# Altium PCB PCB.PcbDoc (part 1 of 3)
Units mm, origin at the board's own origin, x right, y up, seen from the top; angles counter-clockwise.
Board outline 60 x 50 mm, 4 copper layers (Top Layer, Layer 3, Layer 4, Bottom Layer), stack 0.999 mm thick; 112 components, 71 nets, 399 pads, 37 vias.
Unrouted connection lines stored in the file: 18.
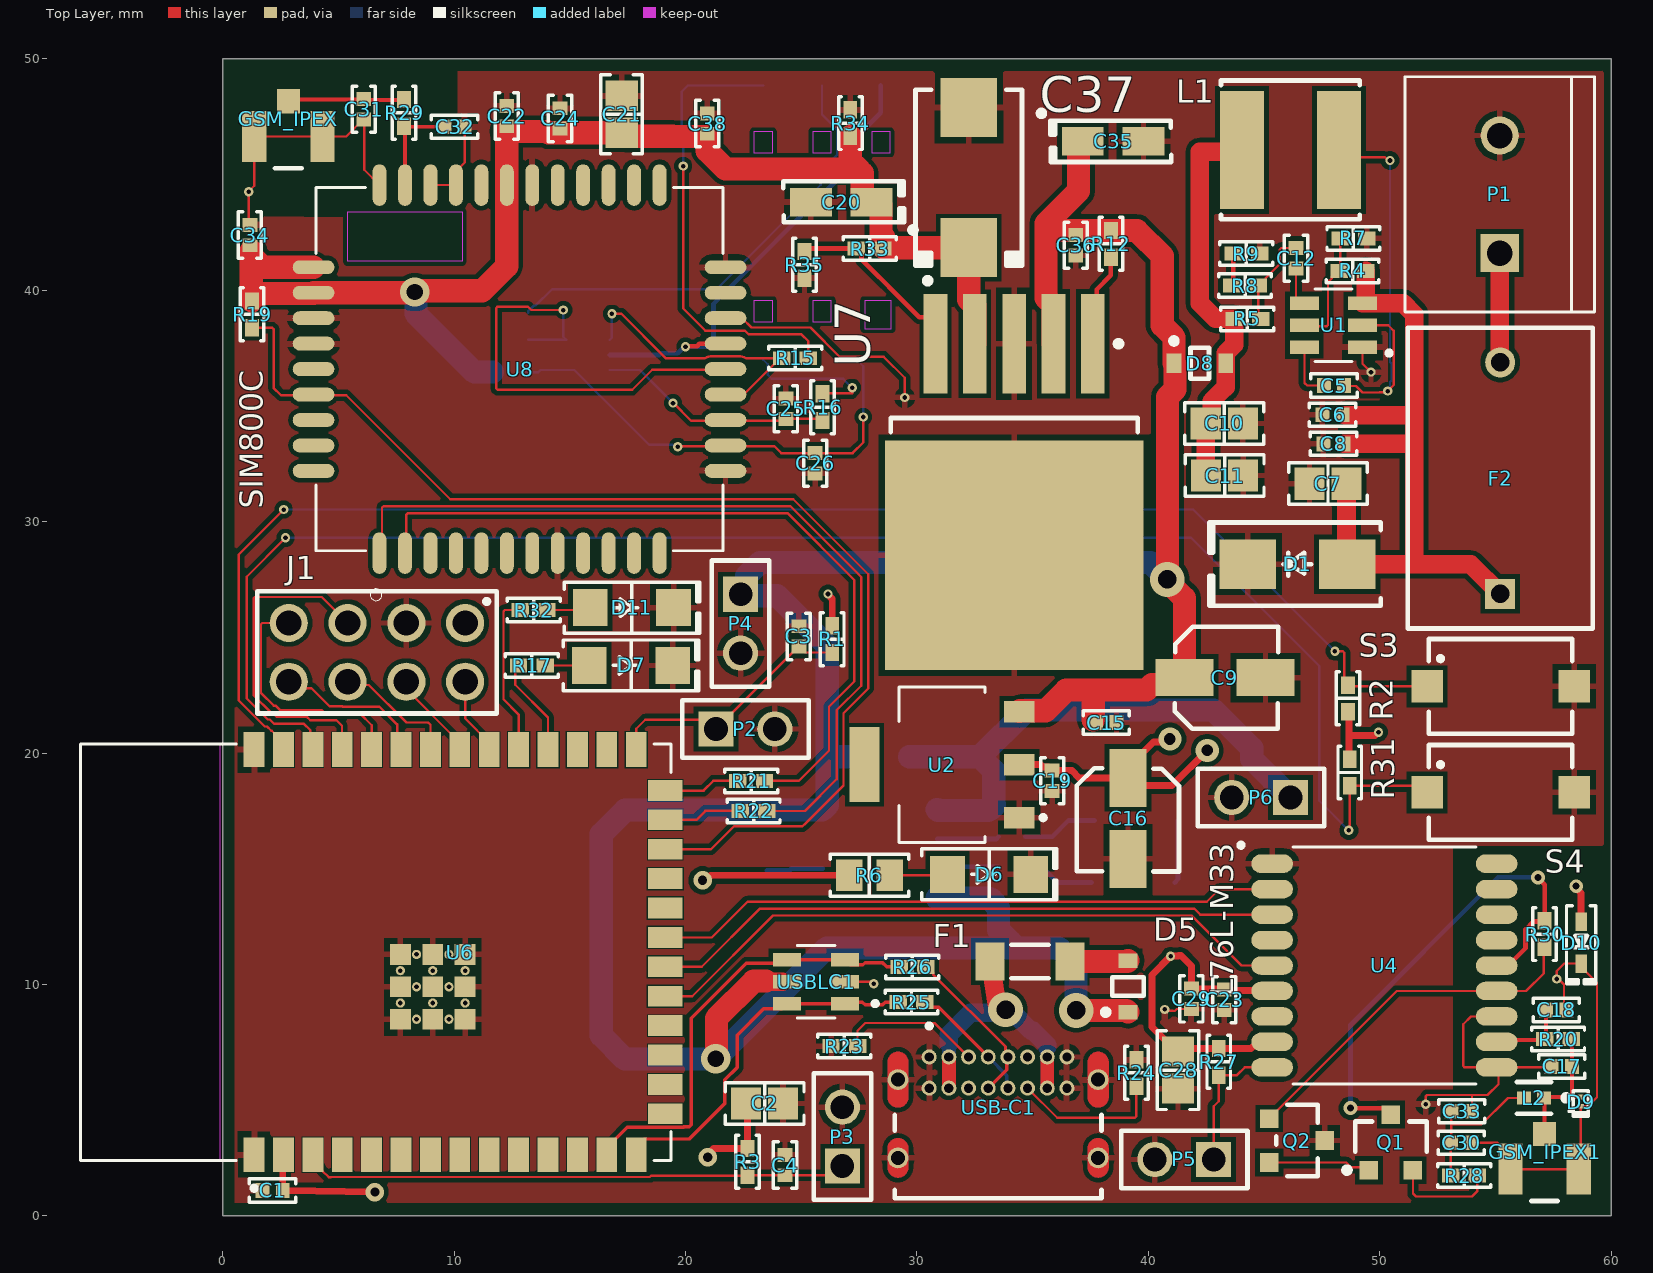
[diagram p0: Top Layer view]
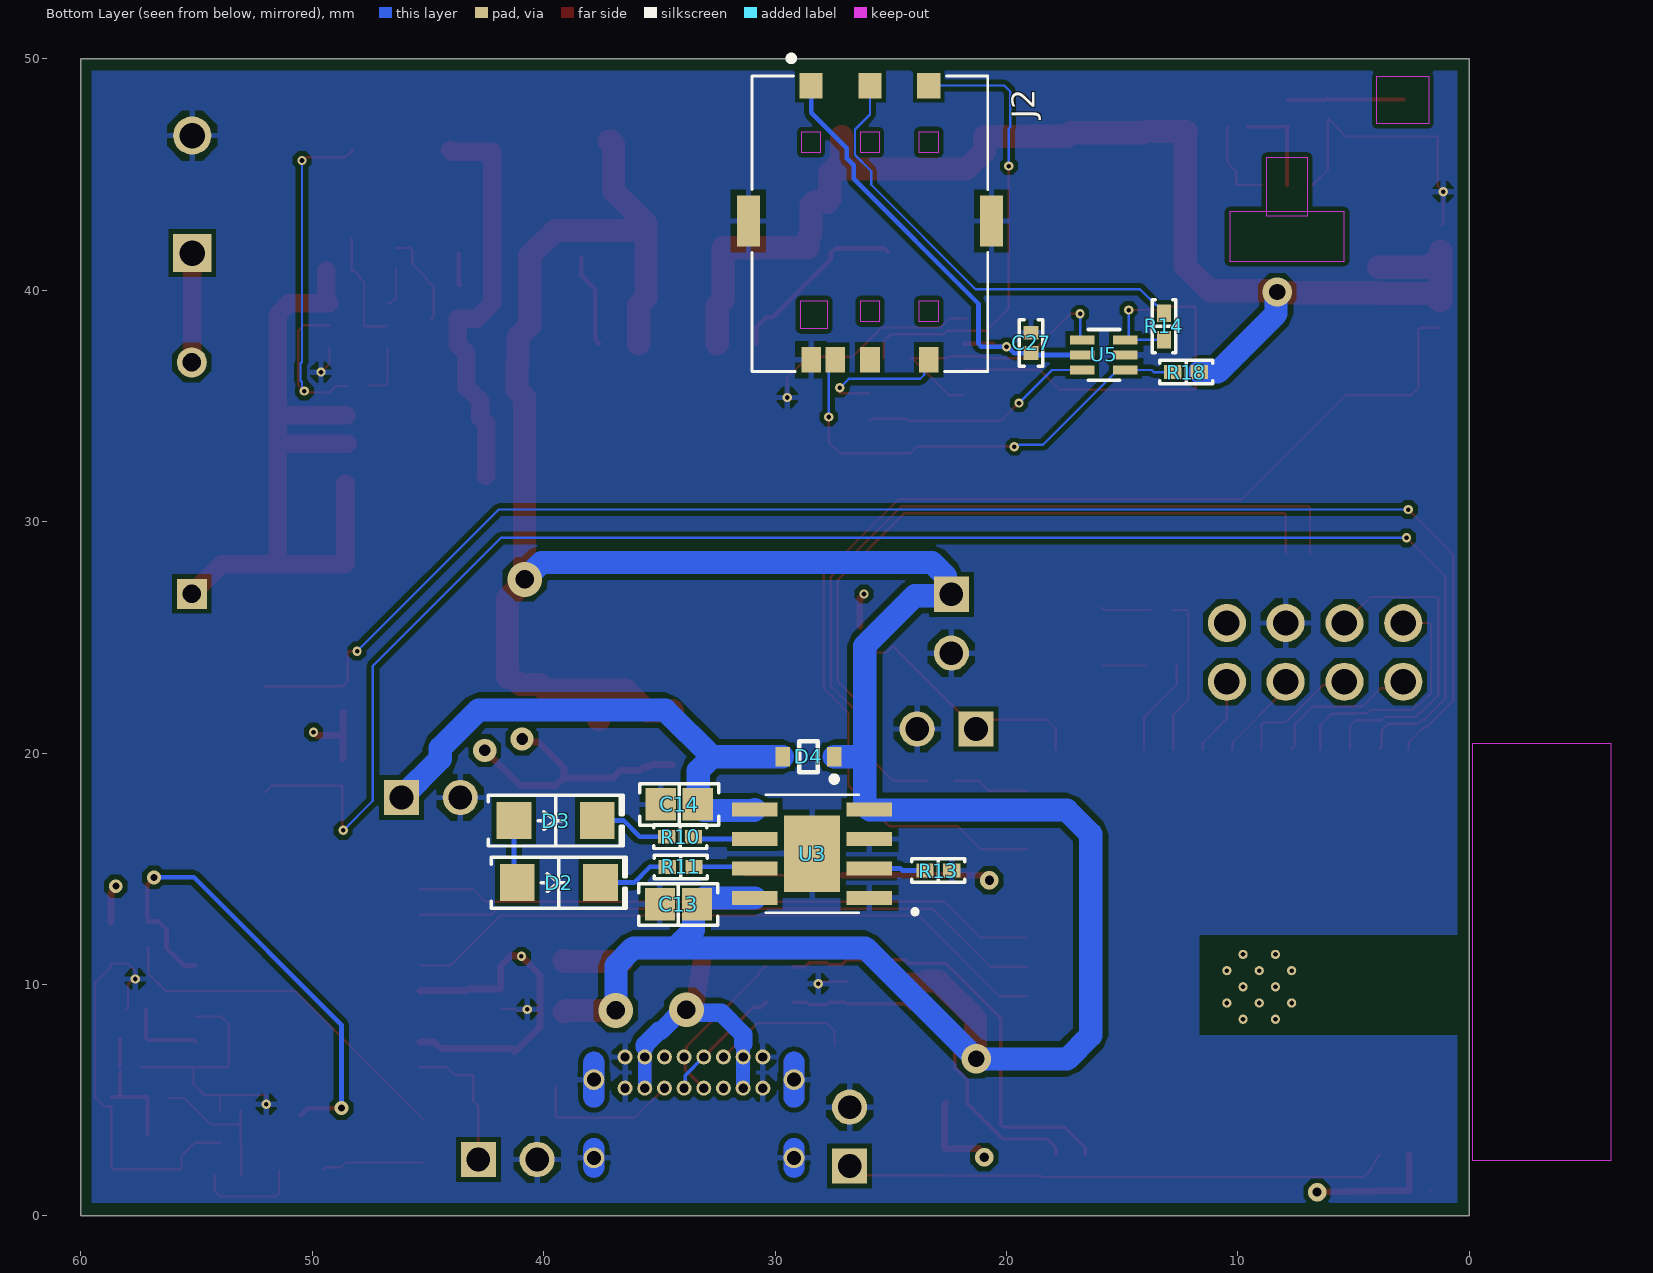
[diagram p1: Bottom Layer view, seen from below]
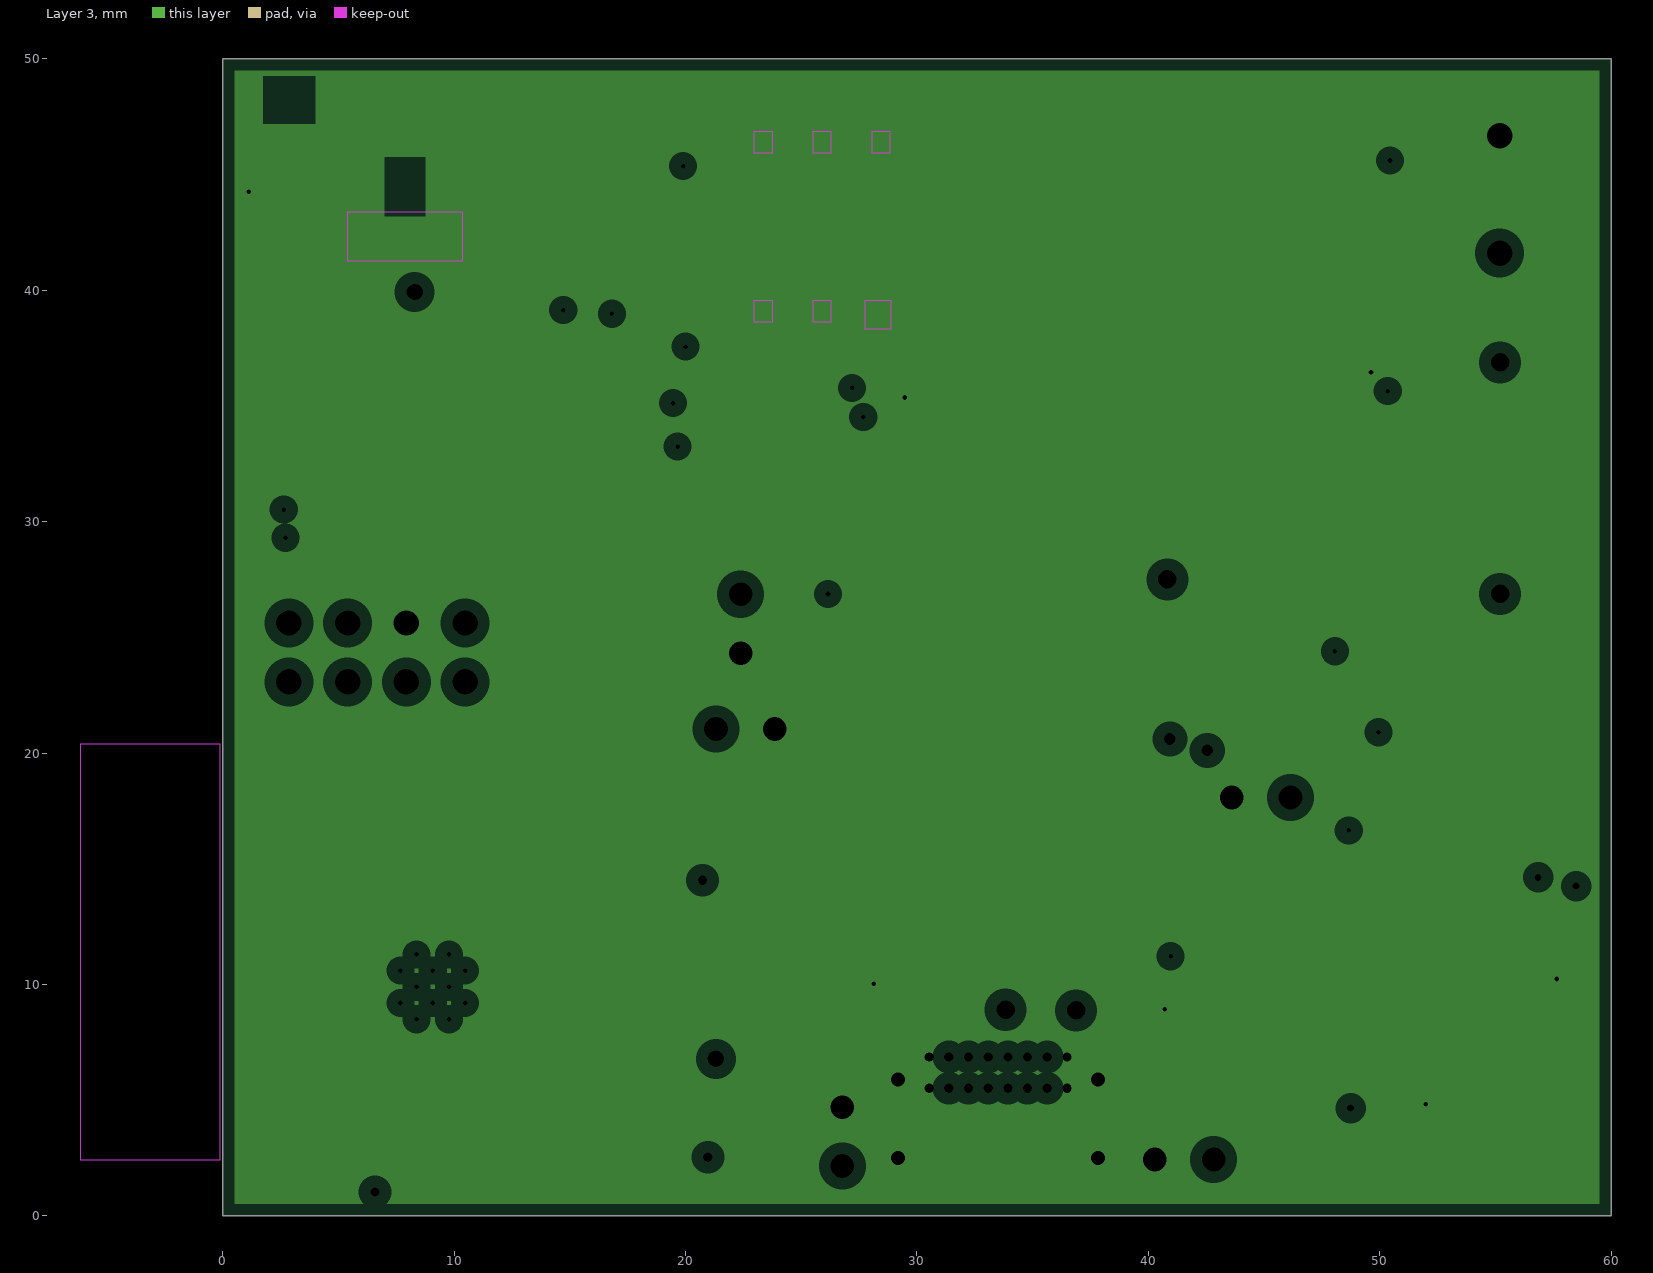
[diagram p2: Layer 3, clearances drawn from the general rule]
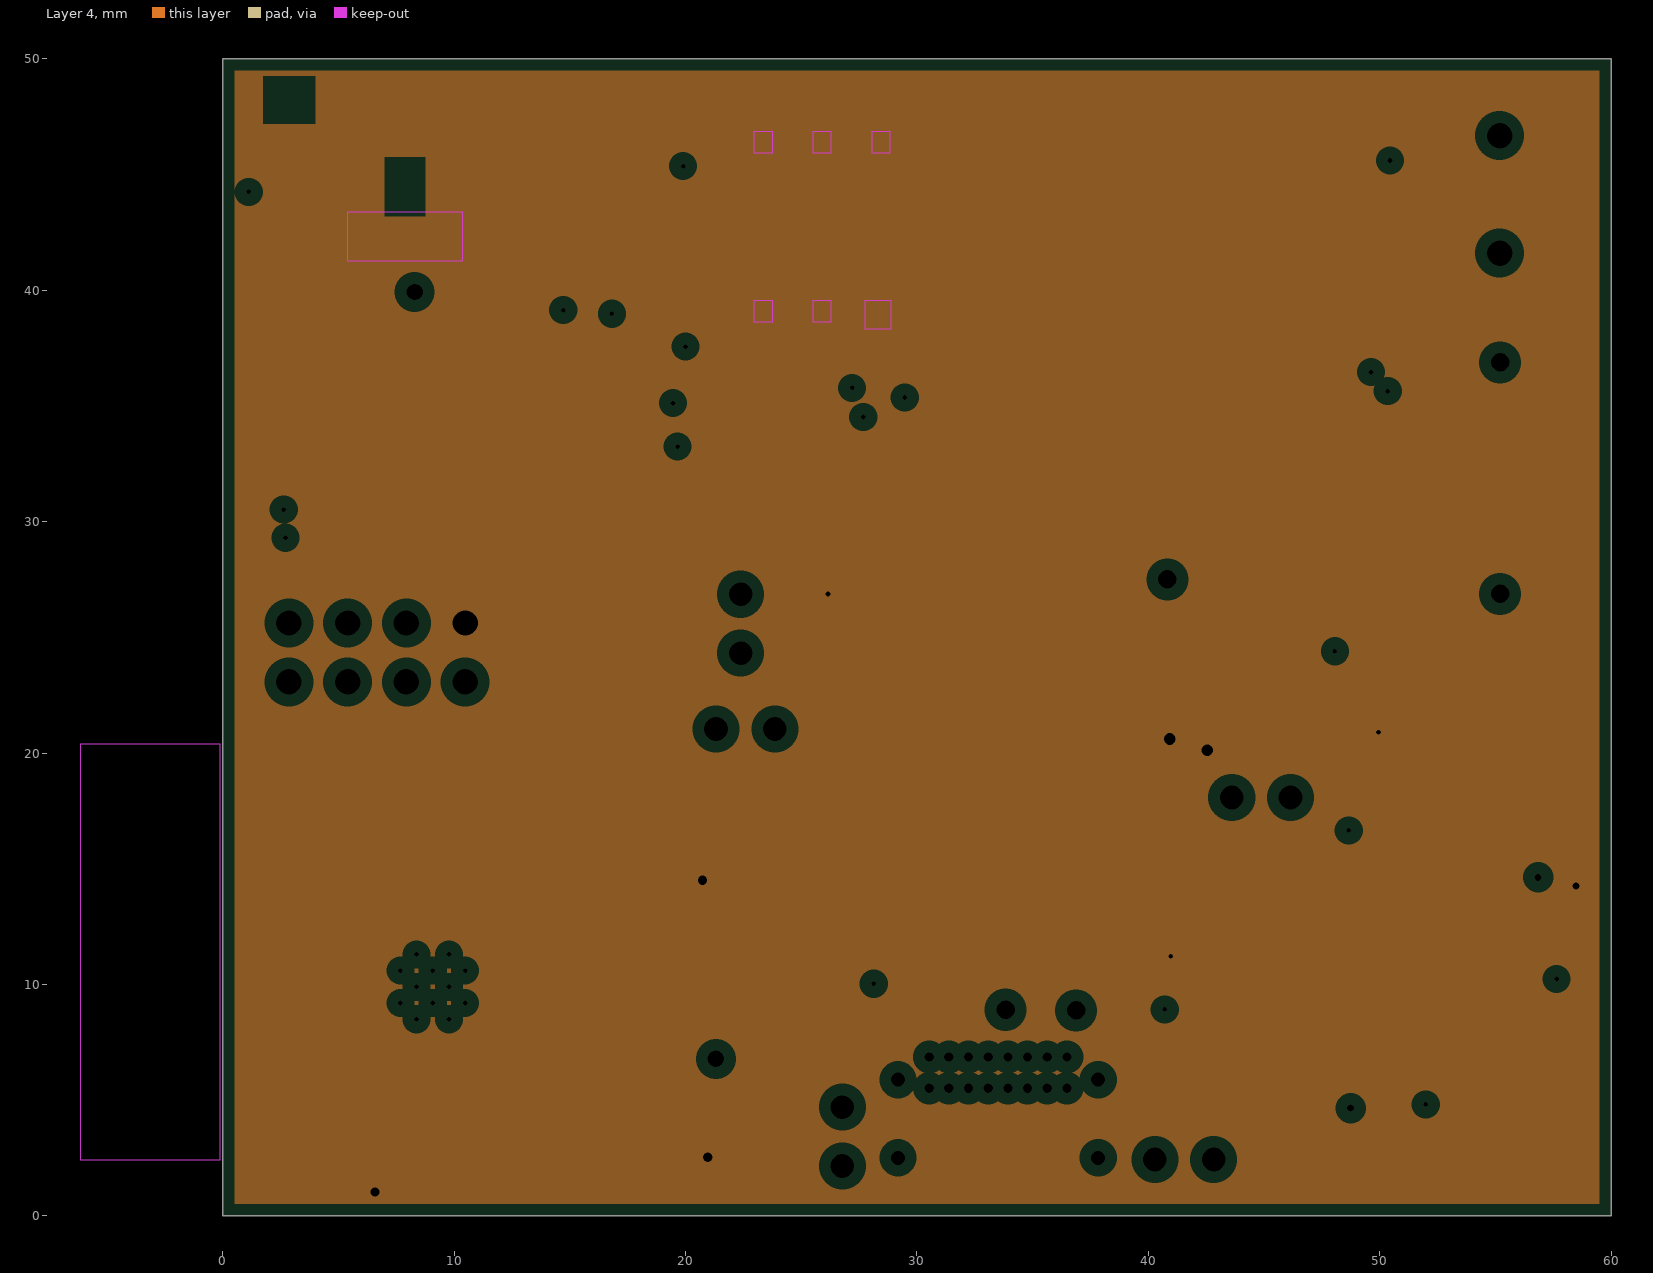
[diagram p3: Layer 4, clearances drawn from the general rule]

## Layer stack, top to bottom
Top Solder: solder mask 0.0102, Solder Resist, Dk 3.5
Top Layer: signal copper 0.035
Dielectric 2: prepreg 0.0994, PP-006, Dk 4.1
Layer 3: plane copper 0.0152, net GND
Dielectric 1: dielectric 0.7, FR-4, Dk 4.8
Layer 4: plane copper 0.0152, net 3V3
Dielectric 3: prepreg 0.0994, PP-006, Dk 4.1
Bottom Layer: signal copper 0.035
Bottom Solder: solder mask 0.0102, Solder Resist, Dk 3.5

## Board outline
0,0 60,0 60,50 0,50

## Design rules (kind name [scope] priority, off if disabled: settings)
Clearance Clearance_sim [InNet('SIM_DET') vs InNet('GND')] p1: gap=0.19 ignorepadtopadclearanceinfootprint=FALSE
Clearance POWER [InNetClass('HIGH VOLTAGE') vs InNet('3V3')] p2: gap=0.2 ignorepadtopadclearanceinfootprint=FALSE
Clearance RF [InNet('GSM_IPEX') vs InNet('RF_IN')] p3: gap=0.5 ignorepadtopadclearanceinfootprint=FALSE
Clearance Clearance_esp32 [InComponent('U6')] p4: gap=0.05 ignorepadtopadclearanceinfootprint=FALSE
Clearance [All] p5: gap=0.2 ignorepadtopadclearanceinfootprint=FALSE
DiffPairsRouting [InDifferentialPairClass('New Class')] p1: maxlimit=0.127 minlimit=0.127 mostfreqgap=0.127 toplayer_minwidth=0.149 toplayer_maxwidth=0.149 toplayer_prefwidth=0.149 bottomlayer_minwidth=0.149 bottomlayer_maxwidth=0.149 bottomlayer_prefwidth=0.149 impedanceprofiledriven=TRUE impedanceprofileid={9743313B-206F-43D8-A250-08B49E2D991E} impedanceprofilevalue=90.000000 maxuncoupledlength=12.7
MinimumSolderMaskSliver [All] p1: minsoldermaskwidth=0
PlaneClearance [All] p1: clearance=0.508
PlaneConnect [All] p1: planeconnectstyle=Direct reliefexpansion=0.508 reliefentries=4 reliefconductorwidth=0.254 reliefairgap=0.254
PolygonConnect U6_GND_Connect [InComponent('U6') vs InPolygon] p1: connectstyle=Relief reliefconductorwidth=0.2 reliefentries=4 polygonreliefangle="90 Angle" airgapwidth=0.2
PolygonConnect [All] p2: connectstyle=Relief reliefconductorwidth=0.254 reliefentries=4 polygonreliefangle="90 Angle" airgapwidth=0.254
RoutingVias [All] p1: holewidth=0.711 width=1.27 viastyle="Through Hole" minholewidth=0.711 minwidth=1.27 maxholewidth=0.711 maxwidth=1.27
SilkToSilkClearance [All] p1: silktosilkclearance=0
SilkToSolderMaskClearance [All] p1: minsilkscreentomaskgap=0 clearancetoexposedcopper=TRUE
SolderMaskExpansion [All] p1: expansion=0.102 istentingtop=FALSE
SupplyNets "Schematic Supply Nets_6" [InNet('VDD')] p1: voltage=0.000
SupplyNets "Schematic Supply Nets_5" [InNet('3V3')] p2: voltage=0.000
SupplyNets "Schematic Supply Nets_3" [InNet('Vout')] p3: voltage=0.000
SupplyNets "Schematic Supply Nets_7" [InNet('VUSB')] p4: voltage=0.000
SupplyNets "Schematic Supply Nets_4" [InNet('GND')] p5: voltage=0.000
SupplyNets "Schematic Supply Nets_2" [InNet('VBAT')] p6: voltage=0.000
SupplyNets "Schematic Supply Nets_1" [InNet('Vin')] p7: voltage=0.000
SupplyNets "Schematic Supply Nets" [InNet('+12')] p8: voltage=0.000
Width Width_RF [InNetClass('RF_CLASSES')] p1: maxlimit=0.171 minlimit=0.171 preferedwidth=0.171 impedanceprofiledriven=TRUE impedanceprofileid={86A5E7C3-8E26-480E-B059-BB30D701D17A} impedanceprofilevalue=50.000000 minimp=50.000000 maximp=50.000000 favimp=50.000000 checkconnectedcopper=TRUE
Width "HIGH POWER" [InNetClass('HIGH VOLTAGE')] p2: maxlimit=1.3 minlimit=0.6 preferedwidth=1
Width 3.3v [InNet('3V3')] p3: maxlimit=0.3 minlimit=0.3 preferedwidth=0.3
Width [All] p4: maxlimit=0.2 minlimit=0.1 preferedwidth=0.1
24 further rules are at their usual default settings.

## Classes and differential pairs
net class Diff_Pair: US_N US_P USBC_N USBC_P
net class RF_CLASSES: GSM GSM_IPEX IPEX_GPS RF_IN
net class "HIGH VOLTAGE": +12 NetF2_2 V_B VBAT VDD Vin Vout VUSB
component class USB-C: F1 R23 R24 R25 R26 USB-C1 USBLC1
component class SIM: C20 C21 C22 C24 C25 C26 C27 C31 C32 C34 C35 C36 C37 C38 GSM_IPEX J2 R12 R14 R15 R16 R18 R19 R21 R22 R29 R33 R34 R35 U5 U7 U8
component class MCU: C1 C2 C3 C4 D7 D11 J1 P2 P3 R1 R2 R3 R17 R31 R32 S3 S4 U6
component class GPS_GNSS: C17 C18 C23 C28 C29 C30 C33 D9 D10 GSM_IPEX1 L2 P5 Q1 Q2 R20 R27 R28 R30 U4
component class Alimentation: C5 C6 C7 C8 C9 C10 C11 C12 C13 C14 C15 C16 C19 D1 D2 D3 D4 D5 D6 D8 F2 L1 P1 P4 P6 R4 R5 R6 R7 R8 R9 R10 R11 R13 U1 U2 U3
differential pair US: +US_P -US_N
differential pair USBC: +USBC_P -USBC_N

## Components (designator, comment, footprint, x,y, rotation, side; value= is the part's Value field where it differs from the comment)
C1 "0.1 µF" "CAP 0402_1005" 2.16,1.1 r0 top
C2 "22 µF" "CAP 0805_2012" 23.42,4.86 r180 top
C3 "0.1 µF" "CAP 0402_1005" 24.9,25.04 r270 top
C4 "0.1 µF" "CAP 0402_1005" 24.3,2.2 r270 top
C5 "0.1 µF" "CAP 0402_1005" 48.02,35.88 r0 top
C6 "0.1 µF" "CAP 0402_1005" 47.96,34.62 r0 top
C7 "10 µF" "CAP 0805_2012" 47.76,31.64 r0 top
C8 "0.1 µF" "CAP 0402_1005" 48,33.36 r0 top
C9 "10 µF" "CAP ALSMD 4.3MM H5.4MM" 43.31,23.26 r0 top
C10 "22 µF" "CAP 0805_2012" 43.28,34.24 r180 top
C11 "22 µF" "CAP 0805_2012" 43.295,31.992 r180 top
C12 "75 pF" "CAP 0402_1005" 46.38,41.38 r270 top
C13 "10 µF" "CAP 0805_2012" 34.18,13.46 r180 bottom
C14 "10 µF" "CAP 0805_2012" 34.14,17.78 r180 bottom
C15 "0.1 µF" "CAP 0402_1005" 38.18,21.32 r180 top
C16 "22 µF" "CAP ALSMD 4.3MM H5.4MM" 39.12,17.18 r270 top
C17 "Value" "CAP 0402_1005" 57.86,6.46 r0 top
C18 "Value" "CAP 0402_1005" 57.62,8.9 r180 top
C19 "0.1 µF" "CAP 0402_1005" 35.84,18.8 r90 top
C20 "100 µF" "CAP POL 1206_3216" 26.73,43.8 r180 top
C21 "10 µF" "CAP 0805_2012" 17.24,47.6 r270 top
C22 "4.7 µF" "CAP 0402_1005" 12.28,47.52 r270 top
C23 "Value" "CAP 0402_1005" 43.28,9.34 r90 top
C24 "Value" "CAP 0402_1005" 14.58,47.42 r270 top
C25 "47 pF" "CAP 0402_1005" 24.34,34.88 r270 top
C26 "47 pF" "CAP 0402_1005" 25.6,32.52 r90 top
C27 "0.1 µF" "CAP 0402_1005" 18.94,37.72 r270 bottom
C28 "10 µF" "CAP 0805_2012" 41.28,6.3 r90 top
C29 "0.1 µF" "CAP 0402_1005" 41.86,9.38 r90 top
C30 "0.1 µF" "CAP 0402_1005" 53.52,3.16 r180 top
C31 "Value" "CAP 0402_1005" 6.1,47.82 r90 top
C32 "Value" "CAP 0402_1005" 10.02,47.06 r180 top
C33 "100 pF" "CAP 0402_1005" 53.54,4.52 r180 top
C34 "10 pF" "CAP 0402_1005" 1.18,42.38 r270 top
C35 "100 µF" "CAP POL 1206_3216" 38.48,46.44 r0 top
C36 "1 µF" "CAP 0402_1005" 36.86,41.94 r90 top
C37 "330 µF" "CAP POL 2917_7343" 32.24,44.86 r90 top
C38 "0.1 µF" "CAP 0402_1005" 20.94,47.2 r270 top
D1 "SMBJ15CA" "DO214AA SMB" 46.44,28.16 r180 top
D2 "Red" "LED 1206_3216 RED" 39.34,14.405 r180 bottom
D3 "Green" "LED 1206_3216 GREEN" 39.48,17.085 r180 bottom
D4 "NSR0320MW2T1G" ONSC-SOD-323-2-477-02_V 28.56,19.84 r0 bottom
D5 "NSR0320MW2T1G" ONSC-SOD-323-2-477-02_V 39.12,9.92 r90 top
D6 "Red" "LED 1206_3216 RED" 33.12,14.76 r0 top
D7 "Red" "LED 1206_3216 RED" 17.647,23.785 r0 top
D8 "NSR0320MW2T1G" ONSC-SOD-323-2-477-02_V 42.22,36.84 r0 top
D9 "PESD5V0S1USF,315" "NEXPERIA SOD962-2 DSN0603-2" 58.68,4.94 r90 top
D10 "ESD5Z3.3T5G" SOD523F 58.7,11.805 r270 top
D11 "Yellow" "LED 1206_3216 YELLOW" 17.685,26.285 r0 top
F1 "MFU1206FF00750P100" "FUSE 1206_3216 0.6MM" 34.885,11 r0 top
F2 "0259003.MX913" FP-0259-MFG 55.2,31.88 r90 top
GSM_IPEX "U.FL-R-SMT-1(10)" FP-U_FL-R-SMT-1_10-MFG 2.84,46.64 r0 top
GSM_IPEX1 "U.FL-R-SMT-1(10)" FP-U_FL-R-SMT-1_10-MFG 57.12,2.02 r0 top
J1 "JTAG" 61300821121 6.67,24.35 r180 top
J2 "2452808-1" *TE_2452808-1_2452808-1(Primary) 25.9,42.915 r0 bottom
L1 "10 µH" "TDK VLS6045EX" 46.14,46.06 r180 top
L2 "LQG15HS47NJ02J" FP-LQG15HH_02-IPC_B 56.66,5.1 r180 top
P1 "282837-2" *TE_282837-2 55.18,44.14 r90 top
P2 "MTLW-102-05-G-S-172" SMTC-MTLW-102-05-X-S-172 21.32,21.04 r0 top
P3 "MTLW-102-05-G-S-172" SMTC-MTLW-102-05-X-S-172 26.78,2.16 r90 top
P4 "MTLW-102-05-G-S-172" SMTC-MTLW-102-05-X-S-172 22.38,26.86 r270 top
P5 "MTLW-102-05-G-S-172" SMTC-MTLW-102-05-X-S-172 42.82,2.44 r180 top
P6 "MTLW-102-05-G-S-172" SMTC-MTLW-102-05-X-S-172 46.14,18.08 r180 top
Q1 "AO3401A" AO-SOT-23-3L_V 50.48,3.18 r90 top
Q2 "AO3400A" FP-SOT23-MFG 46.42,3.26 r0 top
R1 "10 kOhms" "RES 0402_1005" 26.34,24.92 r90 top
R2 "10 kOhms" "RES 0402_1005" 48.62,22.36 r270 top
R3 "10 kOhms" "RES 0402_1005" 22.68,2.34 r90 top
R4 "511 kOhms" "RES 0402_1005" 48.82,40.835 r0 top
R5 "49.9 Ohms" "RES 0402_1005" 44.275,38.76 r180 top
R6 "330 mOhms" "RES 0805_2012" 27.945,14.72 r180 top
R7 "105 kOhms" "RES 0402_1005" 48.86,42.235 r180 top
R8 "78.7 kOhms" "RES 0402_1005" 44.175,40.2 r0 top
R9 "13.3 kOhms" "RES 0402_1005" 44.235,41.58 r180 top
R10 "1 kOhms" "RES 0402_1005" 34.1,16.385 r0 bottom
R11 "1 kOhms" "RES 0402_1005" 34.08,15.08 r0 bottom
R12 "10 kOhms" "RES 0402_1005" 38.38,42 r90 top
R13 "1 kOhms" "RES 0402_1005" 22.945,14.925 r0 bottom
R14 "51 Ohms" "RES 0402_1005" 13.2,38.435 r90 bottom
R15 "51 Ohms" "RES 0402_1005" 24.735,37.06 r0 top
R16 "51 Ohms" "RES 0402_1005" 25.92,34.945 r270 top
R17 "1 kOhms" "RES 0402_1005" 13.36,23.78 r180 top
R18 "4.7 kOhms" "RES 0402_1005" 12.24,36.46 r0 bottom
R19 "10 kOhms" "RES 0402_1005" 1.272,38.954 r90 top
R20 "0 Ohms" "RES 0402_1005" 57.7,7.64 r180 top
R21 "1 kOhms" "RES 0402_1005" 22.84,18.8 r180 top
R22 "1 kOhms" "RES 0402_1005" 22.94,17.5 r0 top
R23 "5.1 kOhms" "RES 0402_1005" 26.86,7.34 r0 top
R24 "5.1 kOhms" "RES 0402_1005" 39.48,6.18 r270 top
R25 "22 Ohms" "RES 0402_1005" 29.765,9.24 r0 top
R26 "22 Ohms" "RES 0402_1005" 29.805,10.76 r0 top
R27 "10 kOhms" "RES 0402_1005" 43.04,6.66 r90 top
R28 "10 Ohms" "RES 0402_1005" 53.64,1.74 r0 top
R29 "0 Ohms" "RES 0402_1005" 7.84,47.66 r270 top
R30 "10 kOhms" "RES 0402_1005" 57.12,12.18 r90 top
R31 "10 kOhms" "RES 0402_1005" 48.7,19.16 r90 top
R32 "1 kOhms" "RES 0402_1005" 13.44,26.18 r180 top
R33 "100 kOhms" "RES 0402_1005" 27.96,41.8 r0 top
R34 "470 Ohms" "RES 0402_1005" 27.12,47.22 r270 top
R35 "43 kOhms" "RES 0402_1005" 25.14,41.095 r90 top
S3 "434123025816" 434123025816 55.22,22.88 r0 top
S4 "434123025816" 434123025816 55.22,18.3 r0 top
U1 "" TPS54302DDCR 48,38.48 r180 top
U2 "AMS1117-3.3" "AMS1117 3.3V" 31.08,19.5 r90 top
U3 "TP4056" TP4056 28.4,15.65 r0 bottom
U4 "L76L-M33" *XCVR_L76L-M33 50.2,10.82 r0 top
U5 "SMF05CT1G" *SOT65P210X110-6N 15.795,37.2 r0 bottom
U6 "ESP32-S3-WROOM-1-N8R2" *XCVR_ESP32-S3-WROOM-1-N8R2_ESP32-S3-WROOM-1-N8R2(Primary) 6.62,11.4 r90 top
U7 "MIC29302AWU-TR" FP-T0263-5LD-PL-1-MFG 34.2,31.715 r180 top
U8 "SIM800C" SIM800C 12.83,36.59 r90 top
USB-C1 "USB4085-GF-A_REVA4" "Conn Type C 2.0" 33.505,2.51 r0 top
USBLC1 "USBLC6-2SC6" USBLC6-2SC6 25.64,10.12 r180 top

## Footprints (in the part's own frame and the unit in brackets; to place one, negate y for a bottom-side part, rotate by r counter-clockwise, add the part's x,y. Pads: shape width x height; smd on the part's side, far side on the other; paste and mask are expansions set on the pad)
61300821121 [mm]
  round 1.65 hole 1.1: 1(-3.81,-1.27) 2(-3.81,1.27) 3(-1.27,-1.27) 4(-1.27,1.27) 5(1.27,-1.27) 6(1.27,1.27) 7(3.81,-1.27) 8(3.81,1.27)
  silkscreen extent -5.18,-2.64 5.18,2.64, body extent -4.95,-2.54 5.21,2.54, height 8.54
434123025816 [mm]
  rect 1.35x1.4 smd paste+0 mask+0.102: 1(-3.175,0) 2(3.175,0)
  silkscreen extent -3.1,-2.05 3.1,2.05, body extent -3.5,-1.95 3.5,1.95, height 2.5
*SOT65P210X110-6N [mm]
  rect 1.06x0.39 smd: 1(-0.935,0.65) 2(-0.935,0) 3(-0.935,-0.65) 4(0.935,-0.65) 5(0.935,0) 6(0.935,0.65)
  silkscreen extent -0.68,-1.1 0.68,1.1, body extent -1.05,-1 1.05,1, height 1.1
*TE_282837-2 [mm]
  rect 1.65x1.65 hole 1.1: 1(-2.54,0)
  round 1.65 hole 1.1: 2(2.54,0)
  silkscreen extent -5.08,-4.1 5.08,4.1, body extent -5.46,-4.19 5.3,4.01, height 10.25
*TE_2452808-1_2452808-1(Primary) [mm]
  rect 1x1.1 smd: C1(2.54,-5.925) C2(0,-5.925) C3(-2.54,-5.925)
  rect 0.85x1.1 smd: C5(2.54,5.925) C6(0,5.925) C7(-2.54,5.925) SW(1.5,5.925)
  rect 1x2.2 smd: GND8(-5.25,-0.075) GND9(5.25,-0.075)
  Keep-Out Layer region: -2.94,4.275 -2.14,4.275 -2.14,3.375 -2.94,3.375
  Keep-Out Layer region: -0.4,4.275 0.4,4.275 0.4,3.375 -0.4,3.375
  Keep-Out Layer region: 1.84,4.575 2.99,4.575 2.99,3.375 1.84,3.375
  Keep-Out Layer region: -2.94,-3.025 -2.14,-3.025 -2.14,-3.925 -2.94,-3.925
  Keep-Out Layer region: -0.4,-3.025 0.4,-3.025 0.4,-3.925 -0.4,-3.925
  Keep-Out Layer region: 2.14,-3.025 2.94,-3.025 2.94,-3.925 2.14,-3.925
  Keep-Out Layer region: -2.94,4.275 -2.14,4.275 -2.14,3.375 -2.94,3.375
  Keep-Out Layer region: -0.4,4.275 0.4,4.275 0.4,3.375 -0.4,3.375
  Keep-Out Layer region: 1.84,4.575 2.99,4.575 2.99,3.375 1.84,3.375
  Keep-Out Layer region: -2.94,-3.025 -2.14,-3.025 -2.14,-3.925 -2.94,-3.925
  Keep-Out Layer region: -0.4,-3.025 0.4,-3.025 0.4,-3.925 -0.4,-3.925
  Keep-Out Layer region: 2.14,-3.025 2.94,-3.025 2.94,-3.925 2.14,-3.925
  Keep-Out Layer region: -2.94,4.275 -2.14,4.275 -2.14,3.375 -2.94,3.375
  Keep-Out Layer region: -0.4,4.275 0.4,4.275 0.4,3.375 -0.4,3.375
  Keep-Out Layer region: 1.84,4.575 2.99,4.575 2.99,3.375 1.84,3.375
  Keep-Out Layer region: -2.94,-3.025 -2.14,-3.025 -2.14,-3.925 -2.94,-3.925
  Keep-Out Layer region: -0.4,-3.025 0.4,-3.025 0.4,-3.925 -0.4,-3.925
  Keep-Out Layer region: 2.14,-3.025 2.94,-3.025 2.94,-3.925 2.14,-3.925
  Keep-Out Layer region: -2.94,4.275 -2.14,4.275 -2.14,3.375 -2.94,3.375
  Keep-Out Layer region: -0.4,4.275 0.4,4.275 0.4,3.375 -0.4,3.375
  Keep-Out Layer region: 1.84,4.575 2.99,4.575 2.99,3.375 1.84,3.375
  Keep-Out Layer region: -2.94,-3.025 -2.14,-3.025 -2.14,-3.925 -2.94,-3.925
  Keep-Out Layer region: -0.4,-3.025 0.4,-3.025 0.4,-3.925 -0.4,-3.925
  Keep-Out Layer region: 2.14,-3.025 2.94,-3.025 2.94,-3.925 2.14,-3.925
  Keep-Out Layer region: -2.94,4.275 -2.14,4.275 -2.14,3.375 -2.94,3.375
  Keep-Out Layer region: -0.4,4.275 0.4,4.275 0.4,3.375 -0.4,3.375
  Keep-Out Layer region: 1.84,4.575 2.99,4.575 2.99,3.375 1.84,3.375
  Keep-Out Layer region: -2.94,-3.025 -2.14,-3.025 -2.14,-3.925 -2.94,-3.925
  Keep-Out Layer region: -0.4,-3.025 0.4,-3.025 0.4,-3.925 -0.4,-3.925
  Keep-Out Layer region: 2.14,-3.025 2.94,-3.025 2.94,-3.925 2.14,-3.925
  Keep-Out Layer region: -2.94,4.275 -2.14,4.275 -2.14,3.375 -2.94,3.375
  Keep-Out Layer region: -0.4,4.275 0.4,4.275 0.4,3.375 -0.4,3.375
  Keep-Out Layer region: 1.84,4.575 2.99,4.575 2.99,3.375 1.84,3.375
  Keep-Out Layer region: -2.94,-3.025 -2.14,-3.025 -2.14,-3.925 -2.94,-3.925
  Keep-Out Layer region: -0.4,-3.025 0.4,-3.025 0.4,-3.925 -0.4,-3.925
  Keep-Out Layer region: 2.14,-3.025 2.94,-3.025 2.94,-3.925 2.14,-3.925
  silkscreen extent -5.09,-7.22 5.09,6.44, body extent -5.43,-5.87 5.43,6.58, height 1.37
*XCVR_ESP32-S3-WROOM-1-N8R2_ESP32-S3-WROOM-1-N8R2(Primary) [mm]
  rect 1.5x0.9 smd: 1(-8.75,5.26) 2(-8.75,3.99) 3(-8.75,2.72) 4(-8.75,1.45) 5(-8.75,0.18) 6(-8.75,-1.09) 7(-8.75,-2.36) 8(-8.75,-3.63) 9(-8.75,-4.9) 10(-8.75,-6.17) 11(-8.75,-7.44) 12(-8.75,-8.71) 13(-8.75,-9.98) 14(-8.75,-11.25) 27(8.75,-11.25) 28(8.75,-9.98) 29(8.75,-8.71) 30(8.75,-7.44) 31(8.75,-6.17) 32(8.75,-4.9) 33(8.75,-3.63) 34(8.75,-2.36) 35(8.75,-1.09) 36(8.75,0.18) 37(8.75,1.45) 38(8.75,2.72) 39(8.75,3.99) 40(8.75,5.26)
  rect 0.9x1.5 smd: 15(-6.985,-12.5) 16(-5.715,-12.5) 17(-4.445,-12.5) 18(-3.175,-12.5) 19(-1.905,-12.5) 20(-0.635,-12.5) 21(0.635,-12.5) 22(1.905,-12.5) 23(3.175,-12.5) 24(4.445,-12.5) 25(5.715,-12.5) 26(6.985,-12.5)
  rect 0.9x0.9 smd: 41_1(-1.5,-2.46) 41_2(-2.9,-2.46) 41_3(-0.1,-2.46) 41_4(-2.9,-3.86) 41_5(-1.5,-3.86) 41_6(-0.1,-3.86) 41_7(-2.9,-1.06) 41_8(-1.5,-1.06) 41_9(-0.1,-1.06)
  round 0.4 hole 0.2: 41_10(-1.5,-1.76) 41_11(-2.9,-1.76) 41_12(-0.1,-1.76) 41_13(-2.9,-3.16) 41_14(-1.5,-3.16) 41_15(-0.1,-3.16) 41_16(-2.2,-1.06) 41_17(-0.8,-1.06) 41_18(-2.2,-2.46) 41_19(-0.8,-2.46) 41_20(-2.2,-3.86) 41_21(-0.8,-3.86)
  Keep-Out Layer region: -9,12.75 9,12.75 9,6.75 -9,6.75
  Keep-Out Layer region: -9,12.75 9,12.75 9,6.75 -9,6.75
  Keep-Out Layer region: -9,12.75 9,12.75 9,6.75 -9,6.75
  Keep-Out Layer region: -9,12.75 9,12.75 9,6.75 -9,6.75
  Keep-Out Layer region: -9,12.75 9,12.75 9,6.75 -9,6.75
  Keep-Out Layer region: -9,12.75 9,12.75 9,6.75 -9,6.75
  Keep-Out Layer region: -9,12.75 9,12.75 9,6.75 -9,6.75
  Keep-Out Layer region: -9,12.75 9,12.75 9,6.75 -9,6.75
  Keep-Out Layer region: -9,12.75 9,12.75 9,6.75 -9,6.75
  silkscreen extent -10.3,-12.75 9,12.75, body extent -9,-12.75 9,12.75, height 3.25
*XCVR_L76L-M33 [mm]
  oval 1.8x0.8 smd: 1(-4.85,4.4) 2(-4.85,3.3) 3(-4.85,2.2) 4(-4.85,1.1) 5(-4.85,0) 6(-4.85,-1.1) 7(-4.85,-2.2) 8(-4.85,-3.3) 9(-4.85,-4.4) 10(4.85,-4.4) 11(4.85,-3.3) 12(4.85,-2.2) 13(4.85,-1.1) 14(4.85,0) 15(4.85,1.1) 16(4.85,2.2) 17(4.85,3.3) 18(4.85,4.4)
  silkscreen extent -6.3,-5.13 3.95,5.3, body extent -4.85,-5.05 4.85,5.05, height 2.49
"AMS1117 3.3V" [mm]
  rect 0.93x1.31 smd: 1(-2.29,-3.345) 2(0,-3.345) 3(2.29,-3.345)
  rect 3.24x1.31 smd: 4(0,3.345)
  silkscreen extent -3.36,-4.47 3.36,1.86, body extent -3.15,-3.5 3.15,3.5, height 1.8
AO-SOT-23-3L_V [mm] "SOT23, 3-Leads, Body 3.1x1.8mm, Pitch 0.95mm"
  rect 0.8x0.8 smd: 1(-1.2,0.95) 2(-1.2,-0.95) 3(1.2,0)
  silkscreen extent -1.32,-1.55 0.9,2.02, body extent -1.5,-1.55 1.5,1.55, height 1.25
"CAP 0402_1005" [mm] "Chip Capacitor, 2-Leads, Body 1.02x0.51mm, IPC Medium Density"
  rect 0.6x0.64 smd: 1(-0.44,0) 2(0.44,0)
  silkscreen extent -1,-0.5 1,0.5, body extent -0.5,-0.26 0.5,0.26, height 0.52
"CAP 0805_2012" [mm] "Chip Capacitor, 2-Leads, Body 2.00x1.20mm, IPC Medium Density"
  rect 1.3x1.4 smd: 1(-0.8,0) 2(0.8,0)
  silkscreen extent -1.7,-0.9 1.7,0.9, body extent -1,-0.64 1,0.64, height 1.26
"CAP ALSMD 4.3MM H5.4MM" [mm] "Aluminum Electrolytic Capacitor, Body 4.30x4.30x5.40mm, IPC Low Density"
  rect 2.5x1.6 smd: 1(-1.75,0) 2(1.75,0)
  silkscreen extent -2.17,-2.21 2.3,2.2, body extent -2.3,-2.2 2.3,2.2, height 5.4
"CAP POL 1206_3216" [mm] "Molded Capacitor, 2-Leads, Body 3.20x1.6mm, IPC Medium Density"
  rect 1.8x1.23 smd: 1(-1.31,0) 2(1.31,0)
  silkscreen extent -3.22,-0.9 2.5,1.32, body extent -1.72,-0.85 1.71,0.85, height 1.7
"CAP POL 2917_7343" [mm] "Molded Capacitor, 2-Leads, Body 7.30x4.30mm, IPC Medium Density"
  rect 2.55x2.45 smd: 1(-3.025,0) 2(3.025,0)
  silkscreen extent -4.57,-2.3 3.8,2.3, body extent -3.65,-2.15 3.65,2.15, height 4.1
"Conn Type C 2.0" [mm] "*GCT_USB4085-GF-A_REVA4_USB4085-GF-A_REVA4(Primary)"
  round 0.65 hole 0.4: A1(-2.975,4.36) A4(-2.125,4.36) A5(-1.275,4.36) A6(-0.425,4.36) A7(0.425,4.36) A8(1.275,4.36) A9(2.125,4.36) A12(2.975,4.36) B1(2.975,3.01) B4(2.125,3.01) B5(1.275,3.01) B6(0.425,3.01) B7(-0.425,3.01) B8(-1.275,3.01) B9(-2.125,3.01) B12(-2.975,3.01)
  round 0.9 hole 0.6: S1(-4.325,0) S2(4.325,0) S3(-4.325,3.38) S4(4.325,3.38)
  Top Layer region: -3.875,0.4 -3.875,-0.4 -3.876,-0.424 -3.877,-0.447 -3.881,-0.47 -3.885,-0.494 -3.89,-0.516 -3.897,-0.539 -3.905,-0.561 -3.914,-0.583 -3.924,-0.604 -3.935,-0.625 -3.948,-0.645 -3.961,-0.665 -3.975,-0.683 -3.991,-0.701 -4.007,-0.718 -4.024,-0.734 -4.042,-0.75 -4.06,-0.764 -4.08,-0.777 -4.1,-0.79 -4.121,-0.801 -4.142,-0.811 -4.164,-0.82 -4.186,-0.828 -4.209,-0.835 -4.231,-0.84 -4.255,-0.844 -4.278,-0.848 -4.301,-0.849 -4.325,-0.85 -4.349,-0.849 -4.372,-0.848 -4.395,-0.844 -4.419,-0.84 -4.441,-0.835 -4.464,-0.828 -4.486,-0.82 -4.508,-0.811 -4.529,-0.801 -4.55,-0.79 -4.57,-0.777 -4.59,-0.764 -4.608,-0.75 -4.626,-0.734 -4.643,-0.718 -4.659,-0.701 -4.675,-0.683 -4.689,-0.665 -4.702,-0.645 -4.715,-0.625 -4.726,-0.604 -4.736,-0.583 -4.745,-0.561 -4.753,-0.539 -4.76,-0.516 -4.765,-0.494 -4.769,-0.47 -4.773,-0.447 -4.774,-0.424 -4.775,-0.4 -4.775,0.4 -4.774,0.424 -4.773,0.447 -4.769,0.47 -4.765,0.494 -4.76,0.516 -4.753,0.539 -4.745,0.561 -4.736,0.583 -4.726,0.604 -4.715,0.625 -4.702,0.645 -4.689,0.665 -4.675,0.683 -4.659,0.701 -4.643,0.718 -4.626,0.734 -4.608,0.75 -4.59,0.764 -4.57,0.777 -4.55,0.79 -4.529,0.801 -4.508,0.811 -4.486,0.82 -4.464,0.828 -4.441,0.835 -4.419,0.84 -4.395,0.844 -4.372,0.848 -4.349,0.849 -4.325,0.85 -4.301,0.849 -4.278,0.848 -4.255,0.844 -4.231,0.84 -4.209,0.835 -4.186,0.828 -4.164,0.82 -4.142,0.811 -4.121,0.801 -4.1,0.79 -4.08,0.777 -4.06,0.764 -4.042,0.75 -4.024,0.734 -4.007,0.718 -3.991,0.701 -3.975,0.683 -3.961,0.665 -3.948,0.645 -3.935,0.625 -3.924,0.604 -3.914,0.583 -3.905,0.561 -3.897,0.539 -3.89,0.516 -3.885,0.494 -3.881,0.47 -3.877,0.447 -3.876,0.424 -3.875,0.4
  Top Layer region: 4.775,0.4 4.775,-0.4 4.774,-0.424 4.773,-0.447 4.769,-0.47 4.765,-0.494 4.76,-0.516 4.753,-0.539 4.745,-0.561 4.736,-0.583 4.726,-0.604 4.715,-0.625 4.702,-0.645 4.689,-0.665 4.675,-0.683 4.659,-0.701 4.643,-0.718 4.626,-0.734 4.608,-0.75 4.59,-0.764 4.57,-0.777 4.55,-0.79 4.529,-0.801 4.508,-0.811 4.486,-0.82 4.464,-0.828 4.441,-0.835 4.419,-0.84 4.395,-0.844 4.372,-0.848 4.349,-0.849 4.325,-0.85 4.301,-0.849 4.278,-0.848 4.255,-0.844 4.231,-0.84 4.209,-0.835 4.186,-0.828 4.164,-0.82 4.142,-0.811 4.121,-0.801 4.1,-0.79 4.08,-0.777 4.06,-0.764 4.042,-0.75 4.024,-0.734 4.007,-0.718 3.991,-0.701 3.975,-0.683 3.961,-0.665 3.948,-0.645 3.935,-0.625 3.924,-0.604 3.914,-0.583 3.905,-0.561 3.897,-0.539 3.89,-0.516 3.885,-0.494 3.881,-0.47 3.877,-0.447 3.876,-0.424 3.875,-0.4 3.875,0.4 3.876,0.424 3.877,0.447 3.881,0.47 3.885,0.494 3.89,0.516 3.897,0.539 3.905,0.561 3.914,0.583 3.924,0.604 3.935,0.625 3.948,0.645 3.961,0.665 3.975,0.683 3.991,0.701 4.007,0.718 4.024,0.734 4.042,0.75 4.06,0.764 4.08,0.777 4.1,0.79 4.121,0.801 4.142,0.811 4.164,0.82 4.186,0.828 4.209,0.835 4.231,0.84 4.255,0.844 4.278,0.848 4.301,0.849 4.325,0.85 4.349,0.849 4.372,0.848 4.395,0.844 4.419,0.84 4.441,0.835 4.464,0.828 4.486,0.82 4.508,0.811 4.529,0.801 4.55,0.79 4.57,0.777 4.59,0.764 4.608,0.75 4.626,0.734 4.643,0.718 4.659,0.701 4.675,0.683 4.689,0.665 4.702,0.645 4.715,0.625 4.726,0.604 4.736,0.583 4.745,0.561 4.753,0.539 4.76,0.516 4.765,0.494 4.769,0.47 4.773,0.447 4.774,0.424 4.775,0.4
  Top Layer region: -3.875,4.13 -3.875,2.63 -3.876,2.606 -3.877,2.583 -3.881,2.56 -3.885,2.536 -3.89,2.514 -3.897,2.491 -3.905,2.469 -3.914,2.447 -3.924,2.426 -3.935,2.405 -3.948,2.385 -3.961,2.365 -3.975,2.347 -3.991,2.329 -4.007,2.312 -4.024,2.296 -4.042,2.28 -4.06,2.266 -4.08,2.253 -4.1,2.24 -4.121,2.229 -4.142,2.219 -4.164,2.21 -4.186,2.202 -4.209,2.195 -4.231,2.19 -4.255,2.186 -4.278,2.182 -4.301,2.181 -4.325,2.18 -4.349,2.181 -4.372,2.182 -4.395,2.186 -4.419,2.19 -4.441,2.195 -4.464,2.202 -4.486,2.21 -4.508,2.219 -4.529,2.229 -4.55,2.24 -4.57,2.253 -4.59,2.266 -4.608,2.28 -4.626,2.296 -4.643,2.312 -4.659,2.329 -4.675,2.347 -4.689,2.365 -4.702,2.385 -4.715,2.405 -4.726,2.426 -4.736,2.447 -4.745,2.469 -4.753,2.491 -4.76,2.514 -4.765,2.536 -4.769,2.56 -4.773,2.583 -4.774,2.606 -4.775,2.63 -4.775,4.13 -4.774,4.154 -4.773,4.177 -4.769,4.2 -4.765,4.224 -4.76,4.246 -4.753,4.269 -4.745,4.291 -4.736,4.313 -4.726,4.334 -4.715,4.355 -4.702,4.375 -4.689,4.394 -4.675,4.413 -4.659,4.431 -4.643,4.448 -4.626,4.464 -4.608,4.48 -4.59,4.494 -4.57,4.507 -4.55,4.52 -4.529,4.531 -4.508,4.541 -4.486,4.55 -4.464,4.558 -4.441,4.565 -4.419,4.57 -4.395,4.574 -4.372,4.578 -4.349,4.579 -4.325,4.58 -4.301,4.579 -4.278,4.578 -4.255,4.574 -4.231,4.57 -4.209,4.565 -4.186,4.558 -4.164,4.55 -4.142,4.541 -4.121,4.531 -4.1,4.52 -4.08,4.507 -4.06,4.494 -4.042,4.48 -4.024,4.464 -4.007,4.448 -3.991,4.431 -3.975,4.413 -3.961,4.394 -3.948,4.375 -3.935,4.355 -3.924,4.334 -3.914,4.313 -3.905,4.291 -3.897,4.269 -3.89,4.246 -3.885,4.224 -3.881,4.2 -3.877,4.177 -3.876,4.154 -3.875,4.13
  Top Layer region: 4.775,4.13 4.775,2.63 4.774,2.606 4.773,2.583 4.769,2.56 4.765,2.536 4.76,2.514 4.753,2.491 4.745,2.469 4.736,2.447 4.726,2.426 4.715,2.405 4.702,2.385 4.689,2.365 4.675,2.347 4.659,2.329 4.643,2.312 4.626,2.296 4.608,2.28 4.59,2.266 4.57,2.253 4.55,2.24 4.529,2.229 4.508,2.219 4.486,2.21 4.464,2.202 4.441,2.195 4.419,2.19 4.395,2.186 4.372,2.182 4.349,2.181 4.325,2.18 4.301,2.181 4.278,2.182 4.255,2.186 4.231,2.19 4.209,2.195 4.186,2.202 4.164,2.21 4.142,2.219 4.121,2.229 4.1,2.24 4.08,2.253 4.06,2.266 4.042,2.28 4.024,2.296 4.007,2.312 3.991,2.329 3.975,2.347 3.961,2.365 3.948,2.385 3.935,2.405 3.924,2.426 3.914,2.447 3.905,2.469 3.897,2.491 3.89,2.514 3.885,2.536 3.881,2.56 3.877,2.583 3.876,2.606 3.875,2.63 3.875,4.13 3.876,4.154 3.877,4.177 3.881,4.2 3.885,4.224 3.89,4.246 3.897,4.269 3.905,4.291 3.914,4.313 3.924,4.334 3.935,4.355 3.948,4.375 3.961,4.394 3.975,4.413 3.991,4.431 4.007,4.448 4.024,4.464 4.042,4.48 4.06,4.494 4.08,4.507 4.1,4.52 4.121,4.531 4.142,4.541 4.164,4.55 4.186,4.558 4.209,4.565 4.231,4.57 4.255,4.574 4.278,4.578 4.301,4.579 4.325,4.58 4.349,4.579 4.372,4.578 4.395,4.574 4.419,4.57 4.441,4.565 4.464,4.558 4.486,4.55 4.508,4.541 4.529,4.531 4.55,4.52 4.57,4.507 4.59,4.494 4.608,4.48 4.626,4.464 4.643,4.448 4.659,4.431 4.675,4.413 4.689,4.394 4.702,4.375 4.715,4.355 4.726,4.334 4.736,4.313 4.745,4.291 4.753,4.269 4.76,4.246 4.765,4.224 4.769,4.2 4.773,4.177 4.774,4.154 4.775,4.13
  Bottom Layer region: -4.775,0.4 -4.775,-0.4 -4.774,-0.424 -4.773,-0.447 -4.769,-0.47 -4.765,-0.494 -4.76,-0.516 -4.753,-0.539 -4.745,-0.561 -4.736,-0.583 -4.726,-0.604 -4.715,-0.625 -4.702,-0.645 -4.689,-0.665 -4.675,-0.683 -4.659,-0.701 -4.643,-0.718 -4.626,-0.734 -4.608,-0.75 -4.59,-0.764 -4.57,-0.777 -4.55,-0.79 -4.529,-0.801 -4.508,-0.811 -4.486,-0.82 -4.464,-0.828 -4.441,-0.835 -4.419,-0.84 -4.395,-0.844 -4.372,-0.848 -4.349,-0.849 -4.325,-0.85 -4.301,-0.849 -4.278,-0.848 -4.255,-0.844 -4.231,-0.84 -4.209,-0.835 -4.186,-0.828 -4.164,-0.82 -4.142,-0.811 -4.121,-0.801 -4.1,-0.79 -4.08,-0.777 -4.06,-0.764 -4.042,-0.75 -4.024,-0.734 -4.007,-0.718 -3.991,-0.701 -3.975,-0.683 -3.961,-0.665 -3.948,-0.645 -3.935,-0.625 -3.924,-0.604 -3.914,-0.583 -3.905,-0.561 -3.897,-0.539 -3.89,-0.516 -3.885,-0.494 -3.881,-0.47 -3.877,-0.447 -3.876,-0.424 -3.875,-0.4 -3.875,0.4 -3.876,0.424 -3.877,0.447 -3.881,0.47 -3.885,0.494 -3.89,0.516 -3.897,0.539 -3.905,0.561 -3.914,0.583 -3.924,0.604 -3.935,0.625 -3.948,0.645 -3.961,0.665 -3.975,0.683 -3.991,0.701 -4.007,0.718 -4.024,0.734 -4.042,0.75 -4.06,0.764 -4.08,0.777 -4.1,0.79 -4.121,0.801 -4.142,0.811 -4.164,0.82 -4.186,0.828 -4.209,0.835 -4.231,0.84 -4.255,0.844 -4.278,0.848 -4.301,0.849 -4.325,0.85 -4.349,0.849 -4.372,0.848 -4.395,0.844 -4.419,0.84 -4.441,0.835 -4.464,0.828 -4.486,0.82 -4.508,0.811 -4.529,0.801 -4.55,0.79 -4.57,0.777 -4.59,0.764 -4.608,0.75 -4.626,0.734 -4.643,0.718 -4.659,0.701 -4.675,0.683 -4.689,0.665 -4.702,0.645 -4.715,0.625 -4.726,0.604 -4.736,0.583 -4.745,0.561 -4.753,0.539 -4.76,0.516 -4.765,0.494 -4.769,0.47 -4.773,0.447 -4.774,0.424 -4.775,0.4
  Bottom Layer region: 3.875,0.4 3.875,-0.4 3.876,-0.424 3.877,-0.447 3.881,-0.47 3.885,-0.494 3.89,-0.516 3.897,-0.539 3.905,-0.561 3.914,-0.583 3.924,-0.604 3.935,-0.625 3.948,-0.645 3.961,-0.665 3.975,-0.683 3.991,-0.701 4.007,-0.718 4.024,-0.734 4.042,-0.75 4.06,-0.764 4.08,-0.777 4.1,-0.79 4.121,-0.801 4.142,-0.811 4.164,-0.82 4.186,-0.828 4.209,-0.835 4.231,-0.84 4.255,-0.844 4.278,-0.848 4.301,-0.849 4.325,-0.85 4.349,-0.849 4.372,-0.848 4.395,-0.844 4.419,-0.84 4.441,-0.835 4.464,-0.828 4.486,-0.82 4.508,-0.811 4.529,-0.801 4.55,-0.79 4.57,-0.777 4.59,-0.764 4.608,-0.75 4.626,-0.734 4.643,-0.718 4.659,-0.701 4.675,-0.683 4.689,-0.665 4.702,-0.645 4.715,-0.625 4.726,-0.604 4.736,-0.583 4.745,-0.561 4.753,-0.539 4.76,-0.516 4.765,-0.494 4.769,-0.47 4.773,-0.447 4.774,-0.424 4.775,-0.4 4.775,0.4 4.774,0.424 4.773,0.447 4.769,0.47 4.765,0.494 4.76,0.516 4.753,0.539 4.745,0.561 4.736,0.583 4.726,0.604 4.715,0.625 4.702,0.645 4.689,0.665 4.675,0.683 4.659,0.701 4.643,0.718 4.626,0.734 4.608,0.75 4.59,0.764 4.57,0.777 4.55,0.79 4.529,0.801 4.508,0.811 4.486,0.82 4.464,0.828 4.441,0.835 4.419,0.84 4.395,0.844 4.372,0.848 4.349,0.849 4.325,0.85 4.301,0.849 4.278,0.848 4.255,0.844 4.231,0.84 4.209,0.835 4.186,0.828 4.164,0.82 4.142,0.811 4.121,0.801 4.1,0.79 4.08,0.777 4.06,0.764 4.042,0.75 4.024,0.734 4.007,0.718 3.991,0.701 3.975,0.683 3.961,0.665 3.948,0.645 3.935,0.625 3.924,0.604 3.914,0.583 3.905,0.561 3.897,0.539 3.89,0.516 3.885,0.494 3.881,0.47 3.877,0.447 3.876,0.424 3.875,0.4
  Bottom Layer region: -4.775,4.13 -4.775,2.63 -4.774,2.606 -4.773,2.583 -4.769,2.56 -4.765,2.536 -4.76,2.514 -4.753,2.491 -4.745,2.469 -4.736,2.447 -4.726,2.426 -4.715,2.405 -4.702,2.385 -4.689,2.365 -4.675,2.347 -4.659,2.329 -4.643,2.312 -4.626,2.296 -4.608,2.28 -4.59,2.266 -4.57,2.253 -4.55,2.24 -4.529,2.229 -4.508,2.219 -4.486,2.21 -4.464,2.202 -4.441,2.195 -4.419,2.19 -4.395,2.186 -4.372,2.182 -4.349,2.181 -4.325,2.18 -4.301,2.181 -4.278,2.182 -4.255,2.186 -4.231,2.19 -4.209,2.195 -4.186,2.202 -4.164,2.21 -4.142,2.219 -4.121,2.229 -4.1,2.24 -4.08,2.253 -4.06,2.266 -4.042,2.28 -4.024,2.296 -4.007,2.312 -3.991,2.329 -3.975,2.347 -3.961,2.365 -3.948,2.385 -3.935,2.405 -3.924,2.426 -3.914,2.447 -3.905,2.469 -3.897,2.491 -3.89,2.514 -3.885,2.536 -3.881,2.56 -3.877,2.583 -3.876,2.606 -3.875,2.63 -3.875,4.13 -3.876,4.154 -3.877,4.177 -3.881,4.2 -3.885,4.224 -3.89,4.246 -3.897,4.269 -3.905,4.291 -3.914,4.313 -3.924,4.334 -3.935,4.355 -3.948,4.375 -3.961,4.394 -3.975,4.413 -3.991,4.431 -4.007,4.448 -4.024,4.464 -4.042,4.48 -4.06,4.494 -4.08,4.507 -4.1,4.52 -4.121,4.531 -4.142,4.541 -4.164,4.55 -4.186,4.558 -4.209,4.565 -4.231,4.57 -4.255,4.574 -4.278,4.578 -4.301,4.579 -4.325,4.58 -4.349,4.579 -4.372,4.578 -4.395,4.574 -4.419,4.57 -4.441,4.565 -4.464,4.558 -4.486,4.55 -4.508,4.541 -4.529,4.531 -4.55,4.52 -4.57,4.507 -4.59,4.494 -4.608,4.48 -4.626,4.464 -4.643,4.448 -4.659,4.431 -4.675,4.413 -4.689,4.394 -4.702,4.375 -4.715,4.355 -4.726,4.334 -4.736,4.313 -4.745,4.291 -4.753,4.269 -4.76,4.246 -4.765,4.224 -4.769,4.2 -4.773,4.177 -4.774,4.154 -4.775,4.13
  Bottom Layer region: 3.875,4.13 3.875,2.63 3.876,2.606 3.877,2.583 3.881,2.56 3.885,2.536 3.89,2.514 3.897,2.491 3.905,2.469 3.914,2.447 3.924,2.426 3.935,2.405 3.948,2.385 3.961,2.365 3.975,2.347 3.991,2.329 4.007,2.312 4.024,2.296 4.042,2.28 4.06,2.266 4.08,2.253 4.1,2.24 4.121,2.229 4.142,2.219 4.164,2.21 4.186,2.202 4.209,2.195 4.231,2.19 4.255,2.186 4.278,2.182 4.301,2.181 4.325,2.18 4.349,2.181 4.372,2.182 4.395,2.186 4.419,2.19 4.441,2.195 4.464,2.202 4.486,2.21 4.508,2.219 4.529,2.229 4.55,2.24 4.57,2.253 4.59,2.266 4.608,2.28 4.626,2.296 4.643,2.312 4.659,2.329 4.675,2.347 4.689,2.365 4.702,2.385 4.715,2.405 4.726,2.426 4.736,2.447 4.745,2.469 4.753,2.491 4.76,2.514 4.765,2.536 4.769,2.56 4.773,2.583 4.774,2.606 4.775,2.63 4.775,4.13 4.774,4.154 4.773,4.177 4.769,4.2 4.765,4.224 4.76,4.246 4.753,4.269 4.745,4.291 4.736,4.313 4.726,4.334 4.715,4.355 4.702,4.375 4.689,4.394 4.675,4.413 4.659,4.431 4.643,4.448 4.626,4.464 4.608,4.48 4.59,4.494 4.57,4.507 4.55,4.52 4.529,4.531 4.508,4.541 4.486,4.55 4.464,4.558 4.441,4.565 4.419,4.57 4.395,4.574 4.372,4.578 4.349,4.579 4.325,4.58 4.301,4.579 4.278,4.578 4.255,4.574 4.231,4.57 4.209,4.565 4.186,4.558 4.164,4.55 4.142,4.541 4.121,4.531 4.1,4.52 4.08,4.507 4.06,4.494 4.042,4.48 4.024,4.464 4.007,4.448 3.991,4.431 3.975,4.413 3.961,4.394 3.948,4.375 3.935,4.355 3.924,4.334 3.914,4.313 3.905,4.291 3.897,4.269 3.89,4.246 3.885,4.224 3.881,4.2 3.877,4.177 3.876,4.154 3.875,4.13
  silkscreen extent -4.47,-1.74 4.47,5.8, body extent -4.47,-4.22 4.47,4.95, height 3.46
"DO214AA SMB" [mm] "Molded Diode, 2-Leads, Body 4.31x3.62mm, IPC Medium Density"
  rect 2.45x2.15 smd: 1(-2.15,0) 2(2.15,0)
  silkscreen extent -3.6,-1.8 3.8,1.8, body extent -2.6,-1.8 2.6,1.8, height 2.4
FP-0259-MFG [mm]
  rect 1.3x1.3 hole 0.8 paste-2539.97 mask+0: 1(-5,0)
  round 1.3 hole 0.8 paste-2539.97 mask+0: 2(5,0)
  silkscreen extent -6.5,-4 6.5,4, body extent -6.6,-4.1 6.6,4.1, height 0.25
FP-LQG15HH_02-IPC_B [mm]
  rect 0.615x0.572 smd paste+0 mask+0: 1(-0.429,0) 2(0.429,0)
  silkscreen extent -1.51,-0.69 0.74,0.69, body extent -0.89,-0.44 0.89,0.44, height 0.25
FP-SOT23-MFG [mm]
  rect 0.8x0.8 smd paste+0 mask+0: 1(-1.2,0.95) 2(-1.2,-0.95) 3(1.2,0)
  silkscreen extent -0.9,-1.55 0.9,1.55, body extent -1.7,-1.78 1.7,1.78, height 0.25
FP-T0263-5LD-PL-1-MFG [mm]
  rect 1.02x4.32 smd paste+0 mask+0: 1(-3.4,-5.97) 2(-1.7,-5.97) 3(0,-5.97) 4(1.7,-5.97) 5(3.4,-5.97)
  rect 11.18x9.91 smd paste+0 mask+0: 6(0,3.175)
  silkscreen extent -5.33,-6.09 5.33,-2.15, body extent -5.18,-7.62 5.18,7.62, height 4.6
FP-U_FL-R-SMT-1_10-MFG [mm]
  rect 1x1.05 smd paste-1000 mask+0: 1(0,1.525)
  rect 1.05x2.2 smd paste-1000 mask+0: 2(-1.475,0) 3(1.475,0)
  silkscreen extent -0.58,-1.38 0.58,-1.38, body extent -2.1,-1.48 2.1,2.15, height 0.25
"FUSE 1206_3216 0.6MM" [mm] "Chip Fuse 1.5A AC 63V DC, 2-Leads, Body 3.10x1.55mm, IPC Medium Densitym"
  rect 1.25x1.65 smd: 1(-1.725,0) 2(1.725,0)
  silkscreen extent -0.8,-0.72 0.8,0.72, body extent -1.55,-0.77 1.55,0.78, height 0.76
"LED 1206_3216 GREEN" [mm] "Chip Diode, 2-Leads, Body 3.13x1.55mm, IPC Medium Density"
  rect 1.5x1.6 smd: 1(-1.8,0) 2(1.8,0)
  silkscreen extent -2.92,-1.1 2.92,1.1, body extent -1.6,-0.8 1.6,0.8, height 0.9
"LED 1206_3216 RED" [mm] "Chip Diode, 2-Leads, Body 3.13x1.55mm, IPC Medium Density"
  rect 1.5x1.6 smd: 1(-1.8,0) 2(1.8,0)
  silkscreen extent -2.92,-1.1 2.92,1.1, body extent -1.6,-0.8 1.6,0.8, height 0.9
"LED 1206_3216 YELLOW" [mm] "Chip Diode, 2-Leads, Body 3.13x1.55mm, IPC Medium Density"
  rect 1.5x1.6 smd: 1(-1.8,0) 2(1.8,0)
  silkscreen extent -2.92,-1.1 2.92,1.1, body extent -1.6,-0.8 1.6,0.8, height 0.9
"NEXPERIA SOD962-2 DSN0603-2" [mm] "DFN, 2-Leads, Body 0.30x0.60mm, Pitch 0.40mm, IPC Medium Density"
  rect 0.2x0.3 smd: 1(-0.2,0) 2(0.2,0)
  silkscreen extent -0.63,-0.33 0.48,0.52, body extent -0.31,-0.16 0.31,0.16, height 0.32
ONSC-SOD-323-2-477-02_V [mm] "SOD, 2-Leads, Body 1.7x1.25mm"
  rect 0.63x0.83 smd: 1(-1.115,0) 2(1.115,0)
  silkscreen extent -1.24,-0.67 0.4,1.09, body extent -0.85,-0.63 0.85,0.63, height 1.06
"RES 0402_1005" [mm] "Chip Resistor, 2-Leads, Body 1.0x0.5mm, IPC Medium Density"
  rect 0.75x0.6 smd: 1(-0.575,0) 2(0.575,0)
  silkscreen extent -1.14,-0.51 1.14,0.51, body extent -0.5,-0.25 0.5,0.25, height 0.35
"RES 0805_2012" [mm] "Chip Resistor, 2-Leads, Body 2.00x1.25mm, IPC Medium Density"
  rect 1.15x1.35 smd: 1(-0.875,0) 2(0.875,0)
  silkscreen extent -1.7,-0.9 1.7,0.9, body extent -1,-0.62 1,0.63, height 0.6
SIM800C [mm] "*LCC110P1570X1760X250-42N"
  oval 1.8x0.6 smd: 1(-7.95,6.05) 2(-7.95,4.95) 3(-7.95,3.85) 4(-7.95,2.75) 5(-7.95,1.65) 6(-7.95,0.55) 7(-7.95,-0.55) 8(-7.95,-1.65) 9(-7.95,-2.75) 10(-7.95,-3.85) 11(-7.95,-4.95) 12(-7.95,-6.05) 22(7.95,-6.05) 23(7.95,-4.95) 24(7.95,-3.85) 25(7.95,-2.75) 26(7.95,-1.65) 27(7.95,-0.55) 28(7.95,0.55) 29(7.95,1.65) 30(7.95,2.75) 31(7.95,3.85) 32(7.95,4.95) 33(7.95,6.05)
  oval 0.6x1.8 smd: 13(-4.4,-8.9) 14(-3.3,-8.9) 15(-2.2,-8.9) 16(-1.1,-8.9) 17(0,-8.9) 18(1.1,-8.9) 19(2.2,-8.9) 20(3.3,-8.9) 21(4.4,-8.9) 34(4.4,8.9) 35(3.3,8.9) 36(2.2,8.9) 37(1.1,8.9) 38(0,8.9) 39(-1.1,8.9) 40(-2.2,8.9) 41(-3.3,8.9) 42(-4.4,8.9)
  Keep-Out Layer region: 4.656,7.43 6.8,7.43 6.8,2.483 4.656,2.483
  Keep-Out Layer region: 4.656,7.43 6.8,7.43 6.8,2.483 4.656,2.483
  Keep-Out Layer region: 4.656,7.43 6.8,7.43 6.8,2.483 4.656,2.483
  silkscreen extent -10,-8.8 7.85,8.8, body extent -7.85,-8.8 7.85,8.8, height 2.5
SMTC-MTLW-102-05-X-S-172 [mm] "Terminal Assembly, 1x2 Pins, Vertical, 2.54mm Pitch, Male"
  rect 1.52x1.52 hole 1.02: 1(0,0)
  round 1.52 hole 1.02: 2(2.54,0)
  silkscreen extent -1.46,-1.24 4,1.24, body extent -1.27,-1.24 3.81,1.24, height 5.89
SOD523F [mm] "SODFL, 2-Leads, Body 0.80x1.60mm, IPC Medium Density"
  rect 0.8x0.5 smd: 1(-0.9,0) 2(0.9,0)
  silkscreen extent -1.6,-0.64 1.8,0.64, body extent -0.8,-0.4 0.8,0.4, height 0.65
"TDK VLS6045EX" [mm] "Inductor, 2-Leads, Body 6.00x6.00mm"
  rect 1.9x5.1 smd: 1(-2.1,0) 2(2.1,0)
  silkscreen extent -3,-3 3,3, body extent -3,-3 3,3, height 4.5
TP4056 [mm] "*SOP127P600X175-9N"
  rect 1.97x0.6 smd: 1(-2.475,1.905) 2(-2.475,0.635) 3(-2.475,-0.635) 4(-2.475,-1.905) 5(2.475,-1.905) 6(2.475,-0.635) 7(2.475,0.635) 8(2.475,1.905)
  rect 2.413x3.302 smd: 9(0,0)
  silkscreen extent -4.54,-2.55 2,2.6, body extent -3,-2.45 3,2.45, height 1.75
TPS54302DDCR [mm]
  rect 1.25x0.59 smd: 1(-1.255,0.95) 2(-1.255,0) 3(-1.255,-0.95) 4(1.255,-0.95) 5(1.255,0) 6(1.255,0.95)
  silkscreen extent -2.5,-1.57 0.8,1.57, body extent -1.4,-1.45 1.4,1.45, height 1.1
USBLC6-2SC6 [mm] "*SOT95P280X145-6N"
  rect 1.21x0.59 smd: 1(-1.255,0.95) 2(-1.255,0) 3(-1.255,-0.95) 4(1.255,-0.95) 5(1.255,0) 6(1.255,0.95)
  silkscreen extent -2.66,-1.57 0.81,1.57, body extent -1.4,-1.4 1.4,1.5, height 1.18

## Part data
C1 C3 C4 C5 C6 C8 C15 C19 C27 C29 C30 C38: library part 885012105001, "CAP CER 0.1UF 6.3V X5R 0402", Device Package="0402 (1005 Metric)", Manufacturer="Würth Elektronik", Operating Temperature="-55°C ~ 85°C", Supplier Part Number 1=732-7478-1-ND, Temperature Coefficient=X5R, Tolerance=±20%, Voltage - Rated=6.3V, Applications="General Purpose", Capacitance="0.1 µF", ComponentLink1Description=Datasheet, ComponentLink1URL=https://katalog.we-online.de/pbs/datasheet/885012105001.pdf, ComponentLink2Description="DigiKey Link", ComponentLink2URL=https://www.digikey.com/en/products/detail/würth-elektronik/885012105001/5453333, lastupdated="06/04/2026 7:11:10 PM", Lifecycle Status=Active, Minimum Order=1, Mounting Type="Surface Mount, MLCC", Package / Case="0402 (1005 Metric)", Packaging=TapeAndReel, Part Number=885012105001, Part Status=Active, partid=1931, Price=0.01, Series=WCAP-CSGP, Size / Dimension="0.039\" L x 0.020\" W (1.00mm x 0.50mm)", Supplier 1=DigiKey, Thickness (Max)="0.022\" (0.55mm)"
C2: library part CM21X5R226M16AT, "0805 X5R 22UF20% 16V", Device Package="0805 (2012 Metric)", Manufacturer="KYOCERA AVX", Operating Temperature="-55°C ~ 85°C", Supplier Part Number 1=478-CM21X5R226M16ATCT-ND, Temperature Coefficient=X5R, Tolerance=±20%, Voltage - Rated=16V, Applications="General Purpose", Capacitance="22 µF", ComponentLink1Description=Datasheet, ComponentLink1URL=https://ele.kyocera.com/assets/products/capacitor/CM_Series_e.pdf, ComponentLink2Description="DigiKey Link", ComponentLink2URL=https://www.digikey.com/en/products/detail/kyocera-avx/CM21X5R226M16AT/17866395, lastupdated="06/04/2026 7:30:11 PM", Lifecycle Status=Active, Minimum Order=1, Mounting Type="Surface Mount, MLCC", Package / Case="0805 (2012 Metric)", Packaging=TapeAndReel, Part Number=CM21X5R226M16AT, Part Status=Active, partid=55250, Price=0.08, Series=CM, Size / Dimension="0.079\" L x 0.049\" W (2.00mm x 1.25mm)", Supplier 1=DigiKey, Thickness (Max)="0.057\" (1.45mm)"
C7 C13 C14 C21 C28: library part GMC21X7S106K6R3NT, "CAP0805 X7S 10UF 10% 6.3V", Device Package="0805 (2012 Metric)", Manufacturer="Cal-Chip Electronics, Inc.", Operating Temperature="-55°C ~ 125°C", Supplier Part Number 1=4713-GMC21X7S106K6R3NTCT-ND, Temperature Coefficient=X7S, Tolerance=±10%, Voltage - Rated=6.3V, Applications="General Purpose", Capacitance="10 µF", ComponentLink1Description=Datasheet, ComponentLink1URL=https://calchip.com/wp-content/uploads/2024/02/gmc_series-1.pdf, ComponentLink2Description="DigiKey Link", ComponentLink2URL=https://www.digikey.com/en/products/detail/cal-chip-electronics-inc/GMC21X7S106K6R3NT/25820663, lastupdated="06/04/2026 7:28:46 PM", Lifecycle Status=Active, Minimum Order=1, Mounting Type="Surface Mount, MLCC", Package / Case="0805 (2012 Metric)", Packaging=TapeAndReel, Part Number=GMC21X7S106K6R3NT, partid=69922, Price=0.08, Series=GMC, Size / Dimension="0.079\" L x 0.049\" W (2.00mm x 1.25mm)", Supplier 1=DigiKey, Thickness (Max)="0.057\" (1.45mm)"
C9: library part UWX1C100MCL1GB, "CAP ALUM 10UF 20% 16V SMD", Device Package="Radial, Can - SMD", Lifetime @ Temp.="2000 Hrs @ 85°C", Manufacturer=Nichicon, Operating Temperature="-40°C ~ 85°C", Ripple Current @ High Frequency="34.5 mA @ 10 kHz", Ripple Current @ Low Frequency="23 mA @ 120 Hz", Supplier Part Number 1=493-2100-1-ND, Tolerance=±20%, Voltage - Rated="16 V", Applications="General Purpose", Capacitance="10 µF", ComponentLink1Description=Datasheet, ComponentLink1URL=https://products.nichicon.co.jp/en/pdf/XJA043/e-uwx.pdf, ComponentLink2Description="DigiKey Link", ComponentLink2URL=https://www.digikey.com/en/products/detail/nichicon/UWX1C100MCL1GB/589841, Height - Seated (Max)="0.213\" (5.40mm)", lastupdated="05/04/2026 8:29:53 PM", Lifecycle Status=Active, Minimum Order=1, Mounting Type="Surface Mount", Package / Case="Radial, Can - SMD", Packaging=TapeAndReel, Part Number=UWX1C100MCL1GB, Part Status=Active, partid=7030, Polarization=Polar, Price=0.06, Series=UWX, Size / Dimension="0.157\" Dia (4.00mm)", Supplier 1=DigiKey, Surface Mount Land Size="0.169\" L x 0.169\" W (4.30mm x 4.30mm)"
C10 C11: library part 08056T226MAT2A, "0805 X7T 22UF20% 6.3V", Device Package="0805 (2012 Metric)", Manufacturer="KYOCERA AVX", Operating Temperature="-55°C ~ 125°C", Supplier Part Number 1=478-08056T226MAT2ACT-ND, Temperature Coefficient=X7T, Tolerance=±20%, Voltage - Rated=6.3V, Applications="General Purpose", Capacitance="22 µF", ComponentLink1Description=Datasheet, ComponentLink1URL=https://media.digikey.com/pdf/Data%20Sheets/AVX%20PDFs/CM03_CM05_CM105_CM21_CM316_Spec.pdf, ComponentLink2Description="DigiKey Link", ComponentLink2URL=https://www.digikey.com/en/products/detail/kyocera-avx/08056T226MAT2A/17866336, lastupdated="06/04/2026 7:30:15 PM", Lifecycle Status=Active, Minimum Order=1, Mounting Type="Surface Mount, MLCC", Package / Case="0805 (2012 Metric)", Packaging=TapeAndReel, Part Number=08056T226MAT2A, Part Status=Active, partid=54855, Price=0.09, Series=CM, Size / Dimension="0.079\" L x 0.049\" W (2.00mm x 1.25mm)", Supplier 1=DigiKey, Thickness (Max)="0.057\" (1.45mm)"
C12: library part GMC04CG750F50NT, "CAP0402 COG 75PF 1% 50V", Device Package="0402 (1005 Metric)", Manufacturer="Cal-Chip Electronics, Inc.", Operating Temperature="-55°C ~ 125°C", Supplier Part Number 1=4713-GMC04CG750F50NTCT-ND, Temperature Coefficient="C0G, NP0", Tolerance=±1%, Voltage - Rated=50V, Applications="General Purpose", Capacitance="75 pF", ComponentLink1Description=Datasheet, ComponentLink1URL=https://calchip.com/wp-content/uploads/2023/09/GMC-Series-2.pdf, ComponentLink2Description="DigiKey Link", ComponentLink2URL=https://www.digikey.com/en/products/detail/cal-chip-electronics-inc/GMC04CG750F50NT/23028995, lastupdated="06/04/2026 7:07:09 PM", Lifecycle Status=Active, Minimum Order=1, Mounting Type="Surface Mount, MLCC", Package / Case="0402 (1005 Metric)", Packaging=TapeAndReel, Part Number=GMC04CG750F50NT, partid=62552, Price=0.01, Series=GMC, Size / Dimension="0.039\" L x 0.020\" W (1.00mm x 0.50mm)", Supplier 1=DigiKey, Thickness (Max)="0.022\" (0.55mm)"
C16: library part EEE-0JA220SR, "CAP ALUM 22UF 20% 6.3V SMD", Device Package="Radial, Can - SMD", Lifetime @ Temp.="2000 Hrs @ 85°C", Manufacturer="Panasonic Electronic Components", Operating Temperature="-40°C ~ 85°C", Ratings=AEC-Q200, Ripple Current @ High Frequency="49.3 mA @ 10 kHz", Ripple Current @ Low Frequency="29 mA @ 120 Hz", Supplier Part Number 1=PCE3857CT-ND, Tolerance=±20%, Voltage - Rated="6.3 V", Applications=Automotive, Capacitance="22 µF", ComponentLink1Description=Datasheet, ComponentLink1URL=//media.digikey.com/pdf/Data%20Sheets/Panasonic%20Electronic%20Components/S_Series,Type_V_Rev2018.pdf, ComponentLink2Description="DigiKey Link", ComponentLink2URL=https://www.digikey.com/en/products/detail/panasonic-electronic-components/EEE-0JA220SR/766025, Height - Seated (Max)="0.213\" (5.40mm)", lastupdated="05/04/2026 8:29:53 PM", Lifecycle Status=Active, Minimum Order=1, Mounting Type="Surface Mount", Package / Case="Radial, Can - SMD", Packaging=TapeAndReel, Part Number=EEE-0JA220SR, Part Status=Active, partid=7032, Polarization=Polar, Price=0.09, Series=S, Size / Dimension="0.157\" Dia (4.00mm)", Supplier 1=DigiKey, Surface Mount Land Size="0.169\" L x 0.169\" W (4.30mm x 4.30mm)"
C17 C18 C31 C32: library part NMC0402X5R105K6.3TRPF, "CAP SMT04021F6.3VDC", Capacitance="1 µF", Part Number=NMC0402X5R105K6.3TRPF
C20 C35: library part T490A107M004ATE500, "CAP TANT 100UF 20% 4V 1206", Device Package="1206 (3216 Metric)", ESR (Equivalent Series Resistance)=500mOhm, Lifetime @ Temp.="1000 Hrs @ 85°C", Manufacturer=KEMET, Manufacturer Size Code=A, Operating Temperature="-55°C ~ 125°C", Supplier Part Number 1=399-11974-1-ND, Tolerance=±20%, Voltage - Rated="4 V", Capacitance="100 µF", ComponentLink1Description=Datasheet, ComponentLink1URL=https://api.kemet.com/component-edge/download/specsheet/T490A107M004ATE500.pdf, ComponentLink2Description="DigiKey Link", ComponentLink2URL=https://www.digikey.com/en/products/detail/kemet/T490A107M004ATE500/5267624, Features="General Purpose", Height - Seated (Max)="0.071\" (1.80mm)", lastupdated="05/04/2026 8:12:52 PM", Lifecycle Status=Active, Minimum Order=1, Mounting Type="Surface Mount", Package / Case="1206 (3216 Metric)", Packaging=TapeAndReel, Part Number=T490A107M004ATE500, Part Status=Active, partid=312, Price=0.29, Series=T490, Size / Dimension="0.126\" L x 0.063\" W (3.20mm x 1.60mm)", Supplier 1=DigiKey, Type=Molded